# Altium PCB Kasli-DIOT.PCBDOC (part 16 of 23)
Units mm, origin at the board's own origin, x right, y up, seen from the top; angles counter-clockwise.
Board outline 222.9 x 100 mm, 10 copper layers (TopLayer, Layer 2, Layer 3, Layer 4, Layer 5, Layer 6, Layer 7, layer 8, Layer 9, BottomLayer), stack 1.564 mm thick; 977 components, 900 nets, 4676 pads, 2725 vias.
Unrouted connection lines stored in the file: 17.
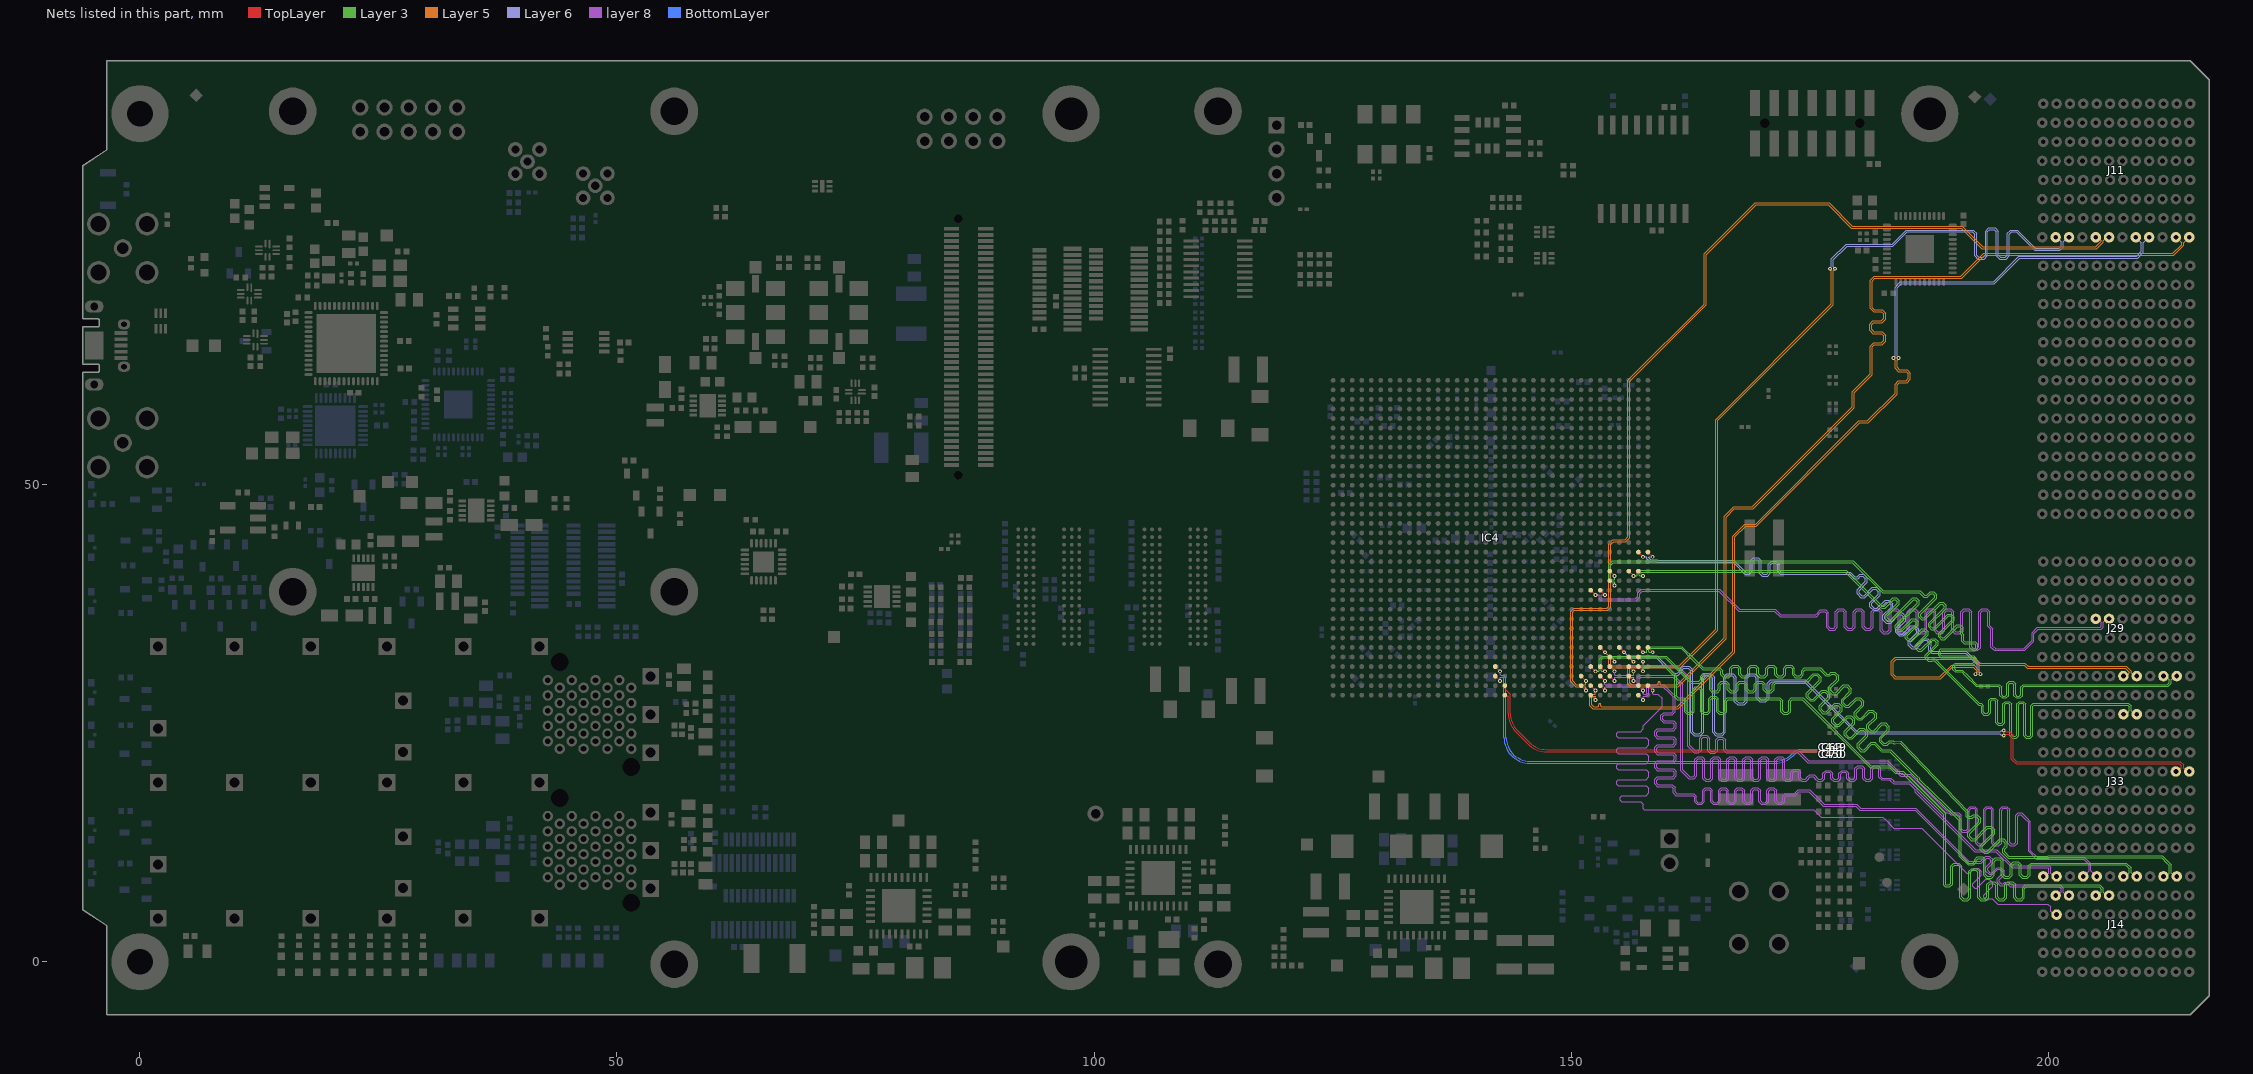
[diagram p22: the nets of this part, all layers, seen from the top]

## Via types
v1: diameter 0.4, hole 0.2, TopLayer to BottomLayer, tented both sides, 1723 vias
v2: diameter 0.5, hole 0.2, TopLayer to BottomLayer, tented both sides, 524 vias
v3: diameter 0.6, hole 0.3, TopLayer to BottomLayer, tented both sides, 172 vias
v4: diameter 0.6, hole 0.3, TopLayer to BottomLayer, 113 vias
v5: diameter 0.5, hole 0.2, TopLayer to BottomLayer, 107 vias
v6: diameter 0.4, hole 0.2, TopLayer to BottomLayer, 67 vias
v7: diameter 0.5, hole 0.25, TopLayer to BottomLayer, tented both sides, 12 vias
v8: diameter 0.8, hole 0.5, TopLayer to BottomLayer, tented both sides, 7 vias

## Nets (pads, with @x,y where several pads share a name; then routed paths per layer and width w, separated by ;. In a path a pad name is that pad's centre, name@x,y a point inside that pad or via, vN(x,y) a via of type N, cw(c..) or ccw(c..) an arc to the next point about the centre after c; other vN are vias at no path point) (continued)
SLOT1.LVDS_4_P: IC4.AN34 J14.K4 | length 97.7
  TopLayer w0.095: IC4.AN34@158.061,28.95 v1(158.561,28.45)
  layer 8 w0.075: v1(158.561,28.45) 158.561,28.095 158.605,28.051 159.117,28.051 159.561,27.607 159.561,26.725 158.207,25.371 157.561,24.725 157.561,24.416 157.283,24.138 154.965,24.138 154.806,23.979 154.806,23.661 154.965,23.501 157.891,23.501 158.169,23.224 158.169,22.738 157.891,22.46 154.965,22.46 154.806,22.301 154.806,21.983 154.965,21.823 157.891,21.823 158.169,21.546 158.169,21.06 157.891,20.782 154.965,20.782 154.806,20.623 154.806,20.305 154.965,20.145 157.891,20.145 158.169,19.868 158.169,19.382 157.891,19.104 154.965,19.104 154.806,18.945 154.806,18.627 154.965,18.467 157.891,18.467 158.169,18.19 158.169,17.704 157.891,17.426 155.31,17.426 155.15,17.267 155.15,16.949 155.31,16.789 157.283,16.789 157.561,16.512 157.561,16.331 157.561,16.069 157.666,15.964 175.44,15.964 175.831,15.573 176.241,15.163 182.701,15.163 182.938,14.926 183.839,14.025 186.751,14.025 186.811,13.966 191.428,9.348 191.497,9.28 191.722,9.28 192.267,9.825 192.66,9.825 193.003,9.481 193.003,9.089 192.083,8.169 192.083,7.944 192.309,7.718 192.534,7.718 193.454,8.638 193.846,8.638 194.19,8.295 194.19,7.902 193.27,6.982 193.27,6.757 193.495,6.532 193.72,6.532 193.786,6.598 194.179,6.598 194.308,6.468 194.376,6.4 194.724,6.052 199.995,6.052 200.301,5.746 200.301,5.299 200.65,4.95 J14.K4@200.9,4.95
SLOT1.LVDS_5_N: IC4.AL33 J14.H5 | length 96.4
  TopLayer w0.095: IC4.AL33@157.061,30.95 v1(157.561,30.45)
  Layer 3 w0.075: v1(157.561,30.45) 157.561,30.805 157.605,30.849 158.128,30.849 158.129,30.85 159.885,30.85 160.872,29.863 160.872,27.74 161.159,27.453 161.483,27.453 161.741,27.453 161.901,27.294 161.901,26.223 162.178,25.945 162.664,25.945 162.942,26.223 162.942,28.471 163.101,28.63 163.419,28.63 163.579,28.471 163.579,26.223 163.856,25.945 164.342,25.945 164.62,26.223 164.62,27.478 164.779,27.637 165.097,27.637 165.257,27.478 165.257,26.223 165.534,25.945 166.02,25.945 166.298,26.223 166.298,27.294 166.457,27.453 171.81,27.453 171.969,27.294 171.969,26.223 172.246,25.945 172.732,25.945 173.01,26.223 173.01,27.294 173.169,27.453 173.266,27.453 174.252,27.453 181.357,20.348 183.39,20.348 183.976,19.763 184.718,19.763 189.068,15.412 189.068,8.012 189.23,7.85 189.535,7.85 189.715,7.85 190.018,8.153 190.018,9.951 190.202,10.135 190.57,10.135 190.755,9.951 190.755,6.73 191.057,6.427 191.593,6.427 191.896,6.73 191.896,9.389 192.08,9.573 192.448,9.573 192.633,9.389 192.633,6.73 192.935,6.427 193.471,6.427 193.774,6.73 193.774,8.024 193.958,8.208 194.326,8.208 194.511,8.024 194.511,6.73 194.813,6.427 195.349,6.427 195.652,6.73 195.652,8.024 195.836,8.208 196.204,8.208 196.389,8.024 196.389,6.73 196.691,6.427 197.227,6.427 197.53,6.73 197.53,7.666 197.714,7.85 199.738,7.85 205.354,7.85 205.599,7.605 205.599,7.311 205.238,6.95 J14.H5@205,6.95
SLOT1.LVDS_5_P: IC4.AK33 J14.G5 | length 96.7
  TopLayer w0.095: IC4.AK33@157.061,31.95 v1(157.561,31.45)
  Layer 3 w0.075: v1(157.561,31.45) 157.561,31.095 157.605,31.051 158.044,31.051 158.045,31.052 159.969,31.052 161.074,29.946 161.074,27.824 161.243,27.655 161.483,27.655 161.825,27.655 162.103,27.377 162.103,26.306 162.262,26.147 162.58,26.147 162.74,26.306 162.74,28.555 163.017,28.832 163.503,28.832 163.781,28.555 163.781,26.306 163.94,26.147 164.258,26.147 164.418,26.306 164.418,27.561 164.695,27.839 165.181,27.839 165.459,27.561 165.459,26.306 165.618,26.147 165.936,26.147 166.096,26.306 166.096,27.377 166.373,27.655 171.893,27.655 172.171,27.377 172.171,26.306 172.33,26.147 172.649,26.147 172.808,26.306 172.808,27.377 173.085,27.655 173.266,27.655 174.336,27.655 181.441,20.55 183.474,20.55 184.059,19.965 184.801,19.965 189.27,15.496 189.27,8.096 189.314,8.052 189.535,8.052 189.631,8.052 189.816,8.236 189.816,10.034 190.118,10.337 190.654,10.337 190.957,10.034 190.957,6.813 191.141,6.629 191.509,6.629 191.694,6.813 191.694,9.472 191.996,9.775 192.532,9.775 192.835,9.472 192.835,6.813 193.019,6.629 193.387,6.629 193.572,6.813 193.572,8.108 193.874,8.41 194.41,8.41 194.713,8.108 194.713,6.813 194.897,6.629 195.265,6.629 195.45,6.813 195.45,8.108 195.752,8.41 196.288,8.41 196.591,8.108 196.591,6.813 196.775,6.629 197.143,6.629 197.328,6.813 197.328,7.749 197.63,8.052 199.738,8.052 205.438,8.052 205.801,7.689 205.801,7.311 206.162,6.95 J14.G5@206.4,6.95
SLOT1.LVDS_6_N: IC4.AP33 J14.K5 | length 96.3
  TopLayer w0.095: IC4.AP33@157.061,27.95 v1(157.561,27.45)
  layer 8 w0.075: v1(157.561,27.45) 157.561,27.805 157.605,27.849 157.961,27.849 158.163,28.051 158.163,28.65 158.363,28.85 159.641,28.85 160.218,28.272 160.705,27.786 160.705,27.569 160.705,26.274 160.546,26.115 159.7,26.115 159.422,25.837 159.422,25.352 159.7,25.074 160.664,25.074 160.824,24.915 160.824,24.596 160.664,24.437 159.043,24.437 158.765,24.159 158.765,23.674 159.043,23.396 160.664,23.396 160.824,23.237 160.824,22.918 160.664,22.759 159.043,22.759 158.765,22.481 158.765,21.996 159.043,21.718 160.664,21.718 160.824,21.559 160.824,21.24 160.664,21.081 159.043,21.081 158.765,20.803 158.765,20.318 159.043,20.04 160.664,20.04 160.824,19.881 160.824,19.562 160.664,19.403 159.043,19.403 158.765,19.125 158.765,18.64 159.043,18.362 160.546,18.362 160.705,18.203 160.705,18.106 160.705,17.723 160.996,17.432 162.625,17.432 162.789,17.432 162.949,17.273 162.949,16.775 163.226,16.497 163.712,16.497 163.99,16.775 163.99,17.881 164.149,18.04 164.467,18.04 164.627,17.881 164.627,16.775 164.904,16.497 165.39,16.497 165.668,16.775 165.668,17.881 165.827,18.04 166.145,18.04 166.305,17.881 166.305,16.775 166.582,16.497 167.068,16.497 167.346,16.775 167.346,17.881 167.505,18.04 167.823,18.04 167.983,17.881 167.983,16.775 168.26,16.497 168.746,16.497 169.024,16.775 169.024,17.881 169.183,18.04 169.501,18.04 169.661,17.881 169.661,16.775 169.938,16.497 170.424,16.497 170.702,16.775 170.702,17.881 170.861,18.04 171.179,18.04 171.339,17.881 171.339,16.775 171.616,16.497 172.102,16.497 172.38,16.775 172.38,17.273 172.539,17.432 172.635,17.432 173.496,17.432 173.896,17.832 174.924,17.832 176.336,16.421 176.454,16.302 179.85,16.302 180.279,15.874 186.074,15.874 191.62,10.328 192.621,10.328 192.734,10.328 193.014,10.328 193.553,10.867 193.779,10.867 194.004,10.642 194.004,10.417 193.481,9.894 193.481,9.502 193.824,9.158 194.217,9.158 194.74,9.681 194.965,9.681 195.19,9.456 195.19,9.23 194.667,8.708 194.667,8.315 195.011,7.971 195.403,7.971 195.559,8.127 195.784,8.127 195.852,8.059 196.061,7.85 201.186,7.85 201.399,7.637 201.399,7.299 201.049,6.95 J14.K5@200.8,6.95
SLOT1.LVDS_6_P: IC4.AN33 J14.J5 | length 96.6
  TopLayer w0.095: IC4.AN33@157.061,28.95 v1(157.561,28.45)
  layer 8 w0.075: v1(157.561,28.45) 157.561,28.095 157.605,28.051 157.877,28.051 157.961,28.135 157.961,28.734 158.279,29.052 159.724,29.052 160.504,28.272 160.907,27.869 160.907,27.569 160.907,26.191 160.63,25.913 159.783,25.913 159.624,25.754 159.624,25.435 159.783,25.276 160.748,25.276 161.026,24.998 161.026,24.513 160.748,24.235 159.126,24.235 158.967,24.076 158.967,23.757 159.126,23.598 160.748,23.598 161.026,23.32 161.026,22.835 160.748,22.557 159.126,22.557 158.967,22.398 158.967,22.079 159.126,21.92 160.748,21.92 161.026,21.642 161.026,21.157 160.748,20.879 159.126,20.879 158.967,20.72 158.967,20.401 159.126,20.242 160.748,20.242 161.026,19.964 161.026,19.479 160.748,19.201 159.126,19.201 158.967,19.042 158.967,18.723 159.126,18.564 160.63,18.564 160.907,18.286 160.907,18.106 160.907,17.806 161.079,17.634 162.625,17.634 162.873,17.634 163.151,17.357 163.151,16.859 163.31,16.699 163.628,16.699 163.788,16.859 163.788,17.965 164.065,18.242 164.551,18.242 164.829,17.965 164.829,16.859 164.988,16.699 165.306,16.699 165.466,16.859 165.466,17.965 165.743,18.242 166.229,18.242 166.507,17.965 166.507,16.859 166.666,16.699 166.984,16.699 167.144,16.859 167.144,17.965 167.421,18.242 167.907,18.242 168.185,17.965 168.185,16.859 168.344,16.699 168.662,16.699 168.822,16.859 168.822,17.965 169.099,18.242 169.585,18.242 169.863,17.965 169.863,16.859 170.022,16.699 170.34,16.699 170.5,16.859 170.5,17.965 170.777,18.242 171.263,18.242 171.541,17.965 171.541,16.859 171.7,16.699 172.018,16.699 172.178,16.859 172.178,17.357 172.455,17.634 172.635,17.634 173.412,17.634 173.812,18.034 175.008,18.034 176.538,16.504 179.934,16.504 180.362,16.076 186.158,16.076 191.704,10.53 192.705,10.53 192.817,10.53 192.93,10.53 193.47,11.069 193.862,11.069 194.206,10.726 194.206,10.333 193.683,9.81 193.683,9.585 193.908,9.36 194.133,9.36 194.656,9.883 195.049,9.883 195.392,9.539 195.392,9.147 194.869,8.624 194.869,8.399 195.095,8.173 195.32,8.173 195.475,8.329 195.868,8.329 195.927,8.27 195.995,8.201 196.145,8.052 201.27,8.052 201.601,7.721 201.601,7.299 201.95,6.95 J14.J5@202.2,6.95
SLOT1.LVDS_7_N: IC4.AJ34 J14.C6 | length 97.1
  TopLayer w0.095: IC4.AJ34@158.061,32.95 v1(158.561,32.45)
  Layer 3 w0.075: v1(158.561,32.45) 158.206,32.45 158.162,32.494 158.162,32.727 158.283,32.848 161.548,32.848 162.662,31.735 163.793,30.603 164.488,30.603 165.524,30.603 165.708,30.419 165.708,30.087 166.011,29.784 166.546,29.784 166.849,30.087 166.849,30.696 167.033,30.88 167.402,30.88 167.586,30.696 167.586,30.087 167.889,29.784 168.424,29.784 168.727,30.087 168.727,30.696 168.911,30.88 169.28,30.88 169.464,30.696 169.464,30.087 169.767,29.784 170.302,29.784 170.605,30.087 170.605,30.696 170.789,30.88 171.158,30.88 171.342,30.696 171.342,30.087 171.645,29.784 172.18,29.784 172.483,30.087 172.483,30.696 172.667,30.88 173.036,30.88 173.22,30.696 173.22,30.087 173.523,29.784 174.058,29.784 174.361,30.087 174.361,30.419 174.545,30.603 176.069,30.603 176.468,30.204 176.536,30.135 176.59,30.082 176.709,29.963 177.137,29.963 177.316,30.142 177.576,30.142 177.837,29.882 177.837,29.621 177.027,28.811 177.027,28.383 177.406,28.004 177.834,28.004 178.644,28.814 178.904,28.814 179.165,28.554 179.165,28.293 178.355,27.483 178.355,27.055 178.734,26.676 179.162,26.676 179.972,27.486 180.232,27.486 180.493,27.226 180.493,26.965 179.683,26.155 179.683,25.727 180.062,25.349 180.49,25.349 181.3,26.159 181.56,26.159 181.821,25.898 181.821,25.637 181.011,24.827 181.011,24.399 181.39,24.021 181.818,24.021 182.628,24.831 182.888,24.831 183.149,24.57 183.149,24.309 182.339,23.499 182.339,23.072 182.718,22.693 183.146,22.693 183.432,22.979 183.693,22.979 183.761,22.911 183.82,22.852 183.988,22.852 183.994,22.858 184.486,22.898 184.52,22.898 184.543,22.875 191.453,15.665 191.453,15.634 191.446,15.312 191.446,15.226 191.505,15.167 191.573,15.098 191.632,15.039 192.06,15.039 192.24,15.219 192.5,15.219 192.761,14.958 192.761,14.698 191.582,13.519 191.582,13.091 191.961,12.712 192.389,12.712 193.686,14.009 193.947,14.009 194.207,13.749 194.207,13.488 192.91,12.191 192.91,11.763 193.289,11.384 193.717,11.384 195.014,12.681 195.275,12.681 195.535,12.421 195.535,12.16 195.237,11.862 195.237,11.434 195.783,10.889 195.811,10.861 195.892,10.861 200.053,10.861 200.099,10.906 211.905,10.906 212.461,10.35 212.699,10.112 212.699,9.299 212.349,8.95 J14.C6@212.1,8.95
SLOT1.LVDS_7_P: IC4.AJ33 J14.B6 | length 97.8
  TopLayer w0.095: IC4.AJ33@157.061,32.95 v1(157.561,32.45)
  Layer 3 w0.075: v1(157.561,32.45) 157.916,32.45 157.96,32.494 157.96,32.81 158.2,33.05 161.632,33.05 162.947,31.735 163.877,30.805 164.488,30.805 165.607,30.805 165.91,30.502 165.91,30.171 166.094,29.986 166.463,29.986 166.647,30.171 166.647,30.779 166.95,31.082 167.485,31.082 167.788,30.779 167.788,30.171 167.972,29.986 168.341,29.986 168.525,30.171 168.525,30.779 168.828,31.082 169.363,31.082 169.666,30.779 169.666,30.171 169.85,29.986 170.219,29.986 170.403,30.171 170.403,30.779 170.706,31.082 171.241,31.082 171.544,30.779 171.544,30.171 171.728,29.986 172.097,29.986 172.281,30.171 172.281,30.779 172.584,31.082 173.119,31.082 173.422,30.779 173.422,30.171 173.606,29.986 173.975,29.986 174.159,30.171 174.159,30.502 174.462,30.805 176.069,30.805 176.152,30.805 176.611,30.347 176.679,30.278 176.792,30.165 177.053,30.165 177.232,30.344 177.66,30.344 178.039,29.965 178.039,29.538 177.229,28.728 177.229,28.467 177.49,28.206 177.75,28.206 178.56,29.016 178.988,29.016 179.367,28.638 179.367,28.21 178.557,27.4 178.557,27.139 178.818,26.878 179.078,26.878 179.888,27.688 180.316,27.688 180.695,27.31 180.695,26.882 179.885,26.072 179.885,25.811 180.146,25.551 180.406,25.551 181.216,26.361 181.644,26.361 182.023,25.982 182.023,25.554 181.213,24.744 181.213,24.483 181.473,24.223 181.734,24.223 182.544,25.033 182.972,25.033 183.351,24.654 183.351,24.226 182.541,23.416 182.541,23.155 182.801,22.895 183.062,22.895 183.348,23.181 183.776,23.181 183.904,23.054 184.565,23.107 184.6,23.107 184.622,23.084 191.656,15.744 191.656,15.713 191.654,15.629 191.648,15.31 191.716,15.241 191.977,15.241 192.156,15.421 192.584,15.421 192.963,15.042 192.963,14.614 191.784,13.435 191.784,13.174 192.045,12.914 192.305,12.914 193.602,14.211 194.03,14.211 194.409,13.832 194.409,13.404 193.112,12.107 193.112,11.846 193.372,11.586 193.633,11.586 194.93,12.883 195.358,12.883 195.737,12.504 195.737,12.076 195.439,11.779 195.439,11.518 195.867,11.091 195.895,11.063 196.094,11.063 199.969,11.063 200.015,11.108 211.989,11.108 212.461,10.636 212.901,10.196 212.901,9.299 213.25,8.95 J14.B6@213.5,8.95
SLOT1.LVDS_8_N: IC4.AL29 J14.F6 | length 102.2
  TopLayer w0.095: IC4.AL29@153.061,30.95 v1(153.561,30.45)
  Layer 3 w0.075: v1(153.561,30.45) 153.206,30.45 153.162,30.494 153.162,31.651 153.361,31.85 159.896,31.85 162.041,29.705 162.539,29.207 162.86,29.207 163.48,29.207 163.783,29.51 163.783,29.842 163.967,30.026 164.336,30.026 164.52,29.842 164.52,28.517 164.822,28.214 165.358,28.214 165.661,28.517 165.661,29.023 165.845,29.207 166.214,29.207 166.398,29.023 166.398,28.517 166.7,28.214 167.236,28.214 167.539,28.517 167.539,29.023 167.723,29.207 168.092,29.207 168.276,29.023 168.276,28.517 168.578,28.214 169.114,28.214 169.417,28.517 169.417,29.023 169.601,29.207 169.97,29.207 170.154,29.023 170.154,28.517 170.456,28.214 170.992,28.214 171.295,28.517 171.295,29.023 171.479,29.207 171.576,29.207 174.09,29.207 174.689,29.207 175.499,30.018 175.76,30.018 176.02,29.757 176.02,29.497 174.676,28.153 174.676,27.725 175.055,27.346 175.483,27.346 176.377,28.24 176.637,28.24 176.898,27.979 176.898,27.719 176.004,26.825 176.004,26.397 176.383,26.018 176.811,26.018 177.705,26.912 177.965,26.912 178.226,26.651 178.226,26.391 177.332,25.497 177.332,25.069 177.711,24.69 178.139,24.69 179.033,25.584 179.293,25.584 179.554,25.323 179.554,25.063 178.66,24.169 178.66,23.741 179.039,23.362 179.467,23.362 180.361,24.256 180.621,24.256 180.882,23.995 180.882,23.735 179.988,22.841 179.988,22.413 180.367,22.034 180.795,22.034 181.547,22.787 181.808,22.787 181.876,22.718 182.491,22.103 ; 182.492,22.102 182.551,22.043 183.426,22.043 186.21,19.259 186.231,19.259 186.356,19.133 186.356,18.985 ; 186.355,18.986 190.666,14.822 190.71,14.778 190.71,11.055 191.615,10.15 191.887,10.15 192.198,10.15 192.5,10.453 192.5,10.623 192.684,10.807 193.053,10.807 193.237,10.623 193.237,9.088 193.54,8.785 194.076,8.785 194.378,9.088 194.378,10.497 194.562,10.681 194.931,10.681 195.115,10.497 195.115,9.088 195.418,8.785 195.954,8.785 196.256,9.088 196.256,10.099 196.44,10.284 196.809,10.284 196.993,10.099 196.993,9.088 197.296,8.785 197.832,8.785 198.134,9.088 198.134,9.966 198.318,10.15 198.415,10.15 208.119,10.15 208.499,9.77 208.499,9.311 208.138,8.95 J14.F6@207.9,8.95
SLOT1.LVDS_8_P: IC4.AL28 J14.E6 | length 102.9
  TopLayer w0.095: IC4.AL28@152.061,30.95 v1(152.561,30.45)
  Layer 3 w0.075: v1(152.561,30.45) 152.916,30.45 152.96,30.494 152.96,31.735 153.277,32.052 159.98,32.052 162.041,29.991 162.622,29.409 162.86,29.409 163.397,29.409 163.581,29.594 163.581,29.925 163.883,30.228 164.419,30.228 164.722,29.925 164.722,28.6 164.906,28.416 165.275,28.416 165.459,28.6 165.459,29.107 165.761,29.409 166.297,29.409 166.6,29.107 166.6,28.6 166.784,28.416 167.153,28.416 167.337,28.6 167.337,29.107 167.639,29.409 168.175,29.409 168.478,29.107 168.478,28.6 168.662,28.416 169.031,28.416 169.215,28.6 169.215,29.107 169.517,29.409 170.053,29.409 170.356,29.107 170.356,28.6 170.54,28.416 170.909,28.416 171.093,28.6 171.093,29.107 171.395,29.409 171.576,29.409 174.292,29.409 174.605,29.409 175.415,30.22 175.843,30.22 176.222,29.841 176.222,29.413 174.878,28.069 174.878,27.809 175.139,27.548 175.399,27.548 176.293,28.442 176.721,28.442 177.1,28.063 177.1,27.635 176.206,26.741 176.206,26.481 176.467,26.22 176.727,26.22 177.621,27.114 178.049,27.114 178.428,26.735 178.428,26.307 177.534,25.413 177.534,25.153 177.795,24.892 178.055,24.892 178.949,25.786 179.377,25.786 179.756,25.407 179.756,24.979 178.862,24.085 178.862,23.825 179.123,23.564 179.383,23.564 180.277,24.458 180.705,24.458 181.084,24.079 181.084,23.651 180.19,22.757 180.19,22.497 180.451,22.236 180.711,22.236 181.464,22.989 181.891,22.989 181.951,22.929 182.019,22.861 182.635,22.245 183.51,22.245 186.294,19.461 186.315,19.461 186.558,19.217 186.558,19.071 ; 186.557,19.072 190.75,15.024 190.912,14.862 190.912,11.138 191.699,10.352 191.887,10.352 192.114,10.352 192.298,10.536 192.298,10.706 192.601,11.009 193.137,11.009 193.439,10.706 193.439,9.172 193.623,8.987 193.992,8.987 194.176,9.172 194.176,10.581 194.479,10.883 195.015,10.883 195.317,10.581 195.317,9.172 195.501,8.987 195.87,8.987 196.054,9.172 196.054,10.183 196.357,10.486 196.893,10.486 197.195,10.183 197.195,9.172 197.379,8.987 197.748,8.987 197.932,9.172 197.932,10.049 198.235,10.352 198.415,10.352 208.203,10.352 208.701,9.854 208.701,9.311 209.062,8.95 J14.E6@209.3,8.95
SLOT1.LVDS_9_N: IC4.AM30 J14.I6 | length 97.9
  TopLayer w0.095: IC4.AM30@154.061,29.95 v1(154.561,29.45)
  layer 8 w0.075: v1(154.561,29.45) 154.561,29.805 154.605,29.849 155.896,29.849 156.163,30.116 156.163,30.702 156.311,30.85 161.068,30.85 161.69,30.228 162.238,29.679 162.238,22.597 162.915,21.92 163.226,21.92 163.406,21.92 163.684,22.198 163.684,23.367 163.843,23.526 164.162,23.526 164.321,23.367 164.321,22.14 164.599,21.862 165.084,21.862 165.362,22.14 165.362,23.196 165.521,23.355 165.84,23.355 165.999,23.196 165.999,22.198 166.277,21.92 167.183,21.92 173.777,21.92 174.811,20.886 183.101,20.886 184.434,19.553 184.552,19.435 185.459,19.435 189.283,15.61 189.592,15.61 189.675,15.527 189.78,15.422 190.567,15.422 190.726,15.262 190.726,13.871 191.004,13.594 191.49,13.594 191.767,13.871 191.767,15.911 191.926,16.071 192.245,16.071 192.404,15.911 192.404,12.427 192.682,12.149 193.168,12.149 193.445,12.427 193.445,15.911 193.604,16.071 193.923,16.071 194.082,15.911 194.082,12.427 194.36,12.149 194.846,12.149 195.123,12.427 195.123,15.911 195.282,16.071 195.601,16.071 195.76,15.911 195.76,12.427 196.038,12.149 196.524,12.149 196.801,12.427 196.801,15.262 196.96,15.422 197.057,15.422 197.154,15.422 197.478,15.097 197.959,14.616 197.959,11.566 198.775,10.75 203.736,10.75 204.299,10.187 204.299,9.549 J14.I6@203.7,8.95
SLOT1.LVDS_9_P: IC4.AL30 J14.H6 | length 98.2
  TopLayer w0.095: IC4.AL30@154.061,30.95 v1(154.561,30.45)
  layer 8 w0.075: v1(154.561,30.45) 154.561,30.095 154.605,30.051 155.812,30.051 155.961,30.2 155.961,30.786 156.227,31.052 161.151,31.052 161.69,30.513 162.44,29.763 162.44,22.68 162.999,22.122 163.226,22.122 163.323,22.122 163.482,22.281 163.482,23.45 163.76,23.728 164.245,23.728 164.523,23.45 164.523,22.224 164.682,22.064 165.001,22.064 165.16,22.224 165.16,23.28 165.438,23.557 165.923,23.557 166.201,23.28 166.201,22.281 166.36,22.122 167.183,22.122 173.861,22.122 174.894,21.088 183.184,21.088 184.636,19.637 185.542,19.637 189.367,15.812 189.675,15.812 189.864,15.624 190.651,15.624 190.928,15.346 190.928,13.955 191.087,13.796 191.406,13.796 191.565,13.955 191.565,15.995 191.843,16.273 192.329,16.273 192.606,15.995 192.606,12.51 192.765,12.351 193.084,12.351 193.243,12.51 193.243,15.995 193.521,16.273 194.007,16.273 194.284,15.995 194.284,12.51 194.443,12.351 194.762,12.351 194.921,12.51 194.921,15.995 195.199,16.273 195.685,16.273 195.962,15.995 195.962,12.51 196.121,12.351 196.44,12.351 196.599,12.51 196.599,15.346 196.877,15.624 197.057,15.624 197.237,15.624 197.764,15.097 198.161,14.7 198.161,11.65 198.859,10.952 203.82,10.952 204.501,10.271 204.501,9.549 J14.H6@205.1,8.95
SLOT1.LVDS_10_N: IC4.AN29 J14.L6 | length 97.7
  TopLayer w0.095: IC4.AN29@153.061,28.95 v1(153.561,28.45)
  layer 8 w0.075: v1(153.561,28.45) 153.561,28.805 153.605,28.849 156.97,28.849 157.163,29.042 157.163,29.675 157.336,29.848 160.678,29.848 161.274,29.252 161.518,29.008 161.518,20.043 162.357,19.204 162.729,19.204 162.91,19.204 163.187,19.482 163.187,21.126 163.346,21.285 163.665,21.285 163.824,21.126 163.824,19.192 164.102,18.914 164.588,18.914 164.865,19.192 164.865,21.126 165.024,21.285 165.343,21.285 165.502,21.126 165.502,19.193 165.78,18.915 166.266,18.915 166.543,19.193 166.543,21.126 166.702,21.286 167.021,21.286 167.18,21.126 167.18,19.193 167.458,18.915 167.944,18.915 168.221,19.193 168.221,21.127 168.38,21.286 168.699,21.286 168.858,21.127 168.858,19.193 169.136,18.916 169.622,18.916 169.899,19.193 169.899,21.127 170.058,21.287 170.377,21.287 170.536,21.127 170.536,19.194 170.814,18.916 171.3,18.916 171.577,19.194 171.577,21.128 171.736,21.287 172.055,21.287 172.214,21.128 172.214,19.194 172.492,18.917 172.978,18.917 173.255,19.194 173.255,19.801 173.414,19.961 173.733,19.961 173.892,19.801 173.892,19.195 174.17,18.917 174.656,18.917 174.933,19.195 174.933,19.251 175.092,19.411 175.411,19.411 175.57,19.251 175.57,19.195 175.848,18.918 176.334,18.918 176.611,19.195 176.611,19.686 176.77,19.845 177.089,19.845 177.248,19.686 177.248,19.196 177.526,18.918 178.012,18.918 178.289,19.196 178.289,19.686 178.448,19.845 178.767,19.845 178.926,19.686 178.926,19.196 179.204,18.918 179.69,18.918 179.967,19.196 179.967,20.184 180.126,20.343 180.445,20.343 180.604,20.184 180.604,19.197 180.882,18.919 181.368,18.919 181.645,19.197 181.645,20.184 181.804,20.343 182.123,20.343 182.282,20.184 182.282,19.335 182.56,19.058 183.041,19.058 183.425,19.058 183.471,19.011 183.471,18.996 183.804,18.664 185.457,18.664 185.6,18.521 186.076,18.045 186.076,17.77 192.314,11.532 194.543,11.532 196.225,9.85 200.036,9.85 200.099,9.787 200.099,9.299 199.749,8.95 J14.L6@199.5,8.95
SLOT1.LVDS_10_P: IC4.AM29 J14.K6 | length 98
  TopLayer w0.095: IC4.AM29@153.061,29.95 v1(153.561,29.45)
  layer 8 w0.075: v1(153.561,29.45) 153.561,29.095 153.605,29.051 156.886,29.051 156.961,29.126 156.961,29.759 157.252,30.05 160.761,30.05 161.559,29.252 161.72,29.091 161.72,20.127 162.44,19.406 162.729,19.406 162.826,19.406 162.985,19.565 162.985,21.209 163.263,21.487 163.749,21.487 164.026,21.209 164.026,19.276 164.185,19.116 164.504,19.116 164.663,19.276 164.663,21.21 164.941,21.487 165.427,21.487 165.704,21.21 165.704,19.276 165.863,19.117 166.182,19.117 166.341,19.276 166.341,21.21 166.619,21.488 167.105,21.488 167.382,21.21 167.382,19.277 167.541,19.117 167.86,19.117 168.019,19.277 168.019,21.211 168.297,21.488 168.783,21.488 169.06,21.211 169.06,19.277 169.219,19.118 169.538,19.118 169.697,19.277 169.697,21.211 169.975,21.489 170.461,21.489 170.738,21.211 170.738,19.278 170.897,19.118 171.216,19.118 171.375,19.278 171.375,21.211 171.653,21.489 172.139,21.489 172.416,21.211 172.416,19.278 172.575,19.119 172.894,19.119 173.053,19.278 173.053,19.885 173.331,20.163 173.817,20.163 174.094,19.885 174.094,19.278 174.253,19.119 174.572,19.119 174.731,19.278 174.731,19.335 175.009,19.613 175.495,19.613 175.772,19.335 175.772,19.279 175.931,19.12 176.25,19.12 176.409,19.279 176.409,19.769 176.687,20.047 177.173,20.047 177.45,19.769 177.45,19.279 177.609,19.12 177.928,19.12 178.087,19.279 178.087,19.769 178.365,20.047 178.851,20.047 179.128,19.769 179.128,19.28 179.287,19.12 179.606,19.12 179.765,19.28 179.765,20.267 180.043,20.545 180.529,20.545 180.806,20.267 180.806,19.28 180.965,19.121 181.284,19.121 181.443,19.28 181.443,20.267 181.721,20.545 182.207,20.545 182.484,20.267 182.484,19.419 182.643,19.26 183.041,19.26 183.508,19.26 183.804,18.964 183.804,18.949 183.888,18.866 185.541,18.866 185.6,18.807 186.278,18.128 186.278,17.853 186.796,17.336 192.398,11.734 194.627,11.734 196.309,10.052 200.12,10.052 200.301,9.871 200.301,9.299 200.65,8.95 J14.K6@200.9,8.95
SLOT1.LVDS_11_N: IC4.AM32 J11.B1 | length 98.9
  TopLayer w0.095: IC4.AM32@156.061,29.95 v1(156.561,29.45)
  Layer 5 w0.08: v1(156.561,29.45) 156.561,29.8 156.514,29.846 156.338,29.846 156.161,29.67 156.161,29.25 156.361,29.05 156.769,29.05 159.007,29.05 ccw(c159.007,29.165) 159.122,29.165 159.122,29.243 cw(c159.237,29.243) 159.237,29.358 cw(c159.237,29.243) 159.352,29.243 159.352,29.165 ccw(c159.467,29.165) 159.467,29.05 159.737,29.05 161.161,29.05 166.054,33.943 166.054,46.686 167.05,47.682 168.993,47.682 179.481,58.17 179.481,59.753 181.354,61.627 181.354,64.154 181.354,64.543 181.711,64.9 182.526,64.9 182.762,65.135 182.762,65.606 182.526,65.842 181.646,65.842 181.29,66.198 181.29,66.841 181.646,67.198 182.526,67.198 182.762,67.433 182.762,67.904 182.526,68.14 181.711,68.14 181.354,68.496 181.354,68.683 181.354,71.436 181.768,71.85 190.868,71.85 193.268,74.25 213.075,74.25 213.996,75.171 213.996,75.354 J11.B1@213.4,75.95
SLOT1.LVDS_11_P: IC4.AL32 J11.A1 | length 99.6
  TopLayer w0.095: IC4.AL32@156.061,30.95 v1(156.561,30.45)
  Layer 5 w0.08: v1(156.561,30.45) 156.561,30.1 156.514,30.053 156.252,30.053 155.954,29.756 155.954,29.164 156.275,28.843 161.247,28.843 166.261,33.857 166.261,46.6 167.136,47.475 169.079,47.475 179.688,58.084 179.688,59.667 181.561,61.541 181.561,64.154 181.561,64.457 181.796,64.693 182.612,64.693 182.969,65.049 182.969,65.692 182.612,66.049 181.732,66.049 181.497,66.284 181.497,66.755 181.732,66.991 182.612,66.991 182.969,67.347 182.969,67.99 182.612,68.347 181.796,68.347 181.561,68.582 181.561,68.683 181.561,71.35 181.854,71.643 190.954,71.643 193.354,74.043 213.161,74.043 214.203,75.085 214.203,75.354 J11.A1@214.8,75.95
SLOT1.LVDS_12_N: IC4.AP28 J11.E1 | length 97.7
  TopLayer w0.095: IC4.AP28@152.061,27.95 v1(152.561,27.45)
  Layer 5 w0.08: v1(152.561,27.45) 152.561,27.8 152.514,27.846 152.339,27.846 152.161,27.668 152.161,26.95 152.361,26.75 152.517,26.75 152.783,26.75 ccw(c152.783,26.865) 152.898,26.865 152.898,26.943 cw(c153.013,26.943) 153.013,27.058 cw(c153.013,26.943) 153.128,26.943 153.128,26.865 ccw(c153.243,26.865) 153.243,26.75 153.513,26.75 161.161,26.75 166.954,32.543 166.954,44.618 168.218,45.882 169.348,45.882 180.156,56.69 181.052,56.69 183.963,59.601 183.963,59.926 183.963,60.558 184.32,60.915 185.135,60.915 185.371,61.15 185.371,61.621 185.135,61.857 184.32,61.857 183.963,62.214 183.963,62.4 183.963,63.073 183.803,63.233 v1(183.803,63.28)
  Layer 6 w0.08: v1(183.803,63.28) 183.803,63.327 183.963,63.487 183.963,70.72 184.536,71.292 194.286,71.292 196.95,73.957 209.293,73.957 209.796,74.46 209.796,75.354 J11.E1@209.2,75.95
SLOT1.LVDS_12_P: IC4.AN28 J11.D1 | length 98.4
  TopLayer w0.095: IC4.AN28@152.061,28.95 v1(152.561,28.45)
  Layer 5 w0.08: v1(152.561,28.45) 152.561,28.1 152.514,28.053 152.254,28.053 151.954,27.754 151.954,26.864 152.275,26.543 161.247,26.543 167.161,32.457 167.161,44.532 168.304,45.675 169.434,45.675 180.241,56.483 181.137,56.483 184.17,59.516 184.17,59.926 184.17,60.472 184.405,60.708 185.221,60.708 185.578,61.065 185.578,61.707 185.221,62.064 184.405,62.064 184.17,62.299 184.17,62.4 184.17,63.073 184.33,63.233 v1(184.33,63.28)
  Layer 6 w0.08: v1(184.33,63.28) 184.33,63.327 184.17,63.487 184.17,70.634 184.621,71.085 194.371,71.085 197.036,73.75 209.378,73.75 210.003,74.375 210.003,75.354 J11.D1@210.6,75.95
SLOT1.LVDS_13_N: IC4.AN27 J11.H1 | length 103.1
  TopLayer w0.095: IC4.AN27@151.061,28.95 v1(151.561,28.45)
  Layer 5 w0.08: v1(151.561,28.45) 151.561,28.8 151.514,28.846 150.472,28.846 149.954,29.364 149.954,36.736 150.268,37.05 153.761,37.05 153.961,37.25 153.961,43.843 154.375,44.257 155.668,44.257 155.954,44.543 155.954,60.943 163.954,68.943 163.954,74.194 169.312,79.552 177.051,79.552 179.48,77.123 190.988,77.123 193.161,74.95 205.014,74.95 205.596,75.533 205.596,75.599 205.245,75.95 J11.H1@205,75.95
SLOT1.LVDS_13_P: IC4.AM27 J11.G1 | length 102.8
  TopLayer w0.095: IC4.AM27@151.061,29.95 v1(151.561,29.45)
  Layer 5 w0.08: v1(151.561,29.45) 151.561,29.1 151.514,29.053 150.558,29.053 150.161,29.45 150.161,36.65 150.354,36.843 153.847,36.843 154.168,37.164 154.168,43.757 154.461,44.05 155.754,44.05 156.161,44.457 156.161,60.857 164.161,68.857 164.161,74.109 169.398,79.345 176.966,79.345 179.395,76.916 190.902,76.916 193.075,74.743 205.099,74.743 205.803,75.447 205.803,75.599 206.154,75.95 J11.G1@206.4,75.95
SLOT1.LVDS_14_N: IC4.AK30 J11.K1 | length 97
  TopLayer w0.095: IC4.AK30@154.061,31.95 v1(154.561,31.45)
  Layer 5 w0.08: v1(154.561,31.45) 154.5,31.511 154.5,31.734 154.263,31.971 154.197,31.971 154.15,31.924 154.15,31.154 154.254,31.05 161.368,31.05 165.154,34.836 165.154,56.843 177.294,68.983 177.294,72.443 177.134,72.603 v1(177.134,72.65)
  Layer 6 w0.08: v1(177.134,72.65) 177.134,72.697 177.294,72.857 177.294,73.676 178.843,75.225 183.651,75.225 185.133,76.707 191.665,76.707 192.15,76.707 192.506,76.35 192.506,74.073 192.742,73.837 193.213,73.837 193.448,74.073 193.448,76.593 193.805,76.949 194.448,76.949 194.804,76.593 194.804,74.073 195.04,73.837 195.511,73.837 195.746,74.073 195.746,76.35 196.103,76.707 196.29,76.707 196.753,76.707 198.685,74.775 201.161,74.775 201.396,75.01 201.396,75.477 200.923,75.95 J11.K1@200.8,75.95
SLOT1.LVDS_14_P: IC4.AJ29 J11.J1 | length 97.6
  TopLayer w0.095: IC4.AJ29@153.061,32.95 v1(153.561,32.45)
  Layer 5 w0.08: v1(153.561,32.45) 153.943,32.068 153.943,31.068 154.168,30.843 161.454,30.843 165.361,34.75 165.361,56.757 177.501,68.897 177.501,72.443 177.661,72.603 v1(177.661,72.65)
  Layer 6 w0.08: v1(177.661,72.65) 177.661,72.697 177.501,72.857 177.501,73.59 178.929,75.018 183.737,75.018 185.219,76.5 191.665,76.5 192.064,76.5 192.299,76.265 192.299,73.987 192.656,73.63 193.299,73.63 193.655,73.987 193.655,76.507 193.891,76.742 194.362,76.742 194.597,76.507 194.597,73.987 194.954,73.63 195.597,73.63 195.953,73.987 195.953,76.265 196.189,76.5 196.29,76.5 196.668,76.5 198.6,74.568 201.247,74.568 201.603,74.925 201.603,75.477 202.076,75.95 J11.J1@202.2,75.95
SLOT1.LVDS_15_N: IC4.AK32 J33.B5 | length 100.1
  TopLayer w0.095: IC4.AK32@156.061,31.95 v1(156.561,31.45) ; v1(195.361,23.723) 195.417,23.723 195.569,23.875 195.922,23.875 196.139,23.658 196.139,21.258 196.647,20.75 213.784,20.75 213.989,20.545 213.989,20.307 213.632,19.95 J33.B5@213.4,19.95
  Layer 6 w0.08: v1(156.561,31.45) 156.275,31.736 156.275,31.802 156.322,31.849 158.925,31.849 160.1,30.675 160.1,30.671 160.508,30.264 160.735,30.037 161.239,30.037 161.596,30.393 161.596,30.523 161.832,30.758 162.303,30.758 162.538,30.523 162.538,24.046 162.895,23.689 163.537,23.689 163.894,24.046 163.894,29.728 164.13,29.963 164.601,29.963 164.836,29.728 164.836,24.046 165.193,23.689 165.835,23.689 166.192,24.046 166.192,29.728 166.428,29.963 166.899,29.963 167.134,29.728 167.134,27.282 167.491,26.925 168.133,26.925 168.49,27.282 168.49,29.728 168.726,29.963 169.197,29.963 169.432,29.728 169.432,27.632 169.789,27.275 170.431,27.275 170.788,27.632 170.788,29.115 171.024,29.35 171.124,29.35 174.467,29.35 179.934,23.883 194.964,23.883 194.971,23.876 ccw(c195.361,24.25) 195.311,23.712 195.32,23.723 v1(195.361,23.723)
SLOT1.LVDS_15_P: IC4.AJ31 J33.A5 | length 100.9
  TopLayer w0.095: IC4.AJ31@155.061,32.95 v1(155.561,32.45) ; v1(195.361,24.25) 195.417,24.25 195.569,24.098 196.013,24.098 196.361,23.75 196.361,21.35 196.739,20.972 213.876,20.972 214.211,20.637 214.211,20.307 214.568,19.95 J33.A5@214.8,19.95
  Layer 6 w0.08: v1(155.561,32.45) 155.955,32.056 159.011,32.056 160.307,30.76 160.307,30.757 160.508,30.556 160.82,30.244 161.154,30.244 161.389,30.479 161.389,30.608 161.746,30.965 162.388,30.965 162.745,30.608 162.745,24.131 162.981,23.896 163.452,23.896 163.687,24.131 163.687,29.813 164.044,30.17 164.686,30.17 165.043,29.813 165.043,24.131 165.279,23.896 165.75,23.896 165.985,24.131 165.985,29.813 166.342,30.17 166.984,30.17 167.341,29.813 167.341,27.367 167.577,27.132 168.048,27.132 168.283,27.367 168.283,29.813 168.64,30.17 169.282,30.17 169.639,29.813 169.639,27.718 169.875,27.482 170.346,27.482 170.581,27.718 170.581,29.2 170.938,29.557 171.124,29.557 174.553,29.557 180.02,24.09 194.964,24.09 194.971,24.097 cw(c195.361,23.723) 195.313,24.261 195.314,24.257 195.32,24.25 v1(195.361,24.25)
SLOT1_MGT.MGT_Rx_N: C450.2 IC4.AM18 | length 43.8
  TopLayer w0.095: IC4.AM18@142.061,29.95 v1(142.561,29.45)
  BottomLayer w0.095: v1(142.561,29.45) 142.561,29.783 142.617,29.839 142.862,29.839 142.961,29.74 142.961,23.561 ccw(c145.719,23.561) 145.719,20.803 171.346,20.803 ccw(c171.346,23.562) 173.297,21.611 173.436,21.75 cw(c174.103,21.083) 174.103,22.026 176.796,22.026 cw(c176.796,21.889) 176.893,21.986 cw(c176.856,21.949) 176.909,21.949 ccw(c176.961,21.949) 176.924,21.912 177.043,21.793 ccw(c177.086,21.835) C450.2@177.086,21.775
SLOT1_MGT.MGT_Rx_P: C449.2 IC4.AL18 | length 43.9
  TopLayer w0.095: IC4.AL18@142.061,30.95 v1(142.561,30.45)
  BottomLayer w0.095: v1(142.561,30.45) 142.561,30.117 142.617,30.061 142.954,30.061 143.183,29.832 143.183,23.565 ccw(c145.723,23.565) 145.723,21.025 171.345,21.025 ccw(c171.345,23.565) 173.141,21.769 173.279,21.907 cw(c174.103,21.084) 174.103,22.248 176.796,22.248 ccw(c176.796,22.386) 176.893,22.289 ccw(c176.856,22.326) 176.909,22.326 cw(c176.961,22.326) 176.924,22.363 177.043,22.482 cw(c177.086,22.44) C449.2@177.086,22.5
SLOT1_MGT.MGT_Tx_N: C70.1 IC4.AP19 | length 38.1
  TopLayer w0.095: IC4.AP19@143.061,27.95 143.128,27.883 143.359,27.883 143.414,27.827 143.414,26.045 ccw(c146.175,26.045) 144.222,24.094 ccw(c146.175,26.045) 144.223,24.093 145.481,22.835 ccw(c147.433,24.787) 145.484,22.832 ccw(c147.433,24.787) 147.433,22.026 176.796,22.026 cw(c176.796,21.889) 176.893,21.986 cw(c176.856,21.949) 176.909,21.949 ccw(c176.961,21.949) 176.924,21.912 177.043,21.793 ccw(c177.086,21.835) C70.1@177.086,21.775
SLOT1_MGT.MGT_Tx_P: C63.1 IC4.AN19 | length 38.7
  TopLayer w0.095: IC4.AN19@143.061,28.95 143.093,28.918 143.093,28.573 143.636,28.029 143.636,26.045 ccw(c146.176,26.045) 144.38,24.249 145.637,22.992 ccw(c147.433,24.788) 147.433,22.248 176.796,22.248 ccw(c176.796,22.386) 176.893,22.289 ccw(c176.856,22.326) 176.909,22.326 cw(c176.961,22.326) C63.1@176.924,22.363 ; C63.1@176.924,22.363 177.043,22.482 cw(c177.086,22.44) C63.1@177.086,22.5
SLOT2.LVDS_0_N: IC4.AB30 J29.C2 | length 101.8
  TopLayer w0.095: IC4.AB30@154.061,39.95 v1(154.561,39.45)
  Layer 3 w0.075: v1(154.561,39.45) 154.561,39.805 154.517,39.849 154.161,39.849 153.93,40.08 153.93,41.62 154.362,42.052 179.559,42.052 182.74,38.871 186.606,38.871 187.011,38.466 187.079,38.398 187.269,38.398 187.649,38.778 188.006,38.778 188.314,38.47 188.314,38.113 186.633,36.431 186.633,36.241 186.823,36.051 187.012,36.051 188.647,37.686 189.004,37.686 189.313,37.378 189.313,37.021 187.678,35.386 187.678,35.196 187.868,35.006 188.057,35.006 189.502,36.45 189.859,36.45 190.167,36.142 190.167,35.785 188.723,34.341 188.723,34.151 188.913,33.961 189.103,33.961 190.449,35.307 190.806,35.307 191.114,34.999 191.114,34.642 191.07,34.597 191.07,34.407 191.18,34.297 191.18,33.979 191.18,33.768 191.18,33.672 191.314,33.537 192.382,33.537 192.635,33.285 192.635,32.849 192.382,32.596 188.861,32.596 188.727,32.462 188.727,32.194 188.861,32.059 192.213,32.059 192.466,31.807 192.466,31.371 192.213,31.118 190.339,31.118 190.205,30.984 190.205,30.716 190.339,30.581 191.03,30.581 191.567,30.044 192.546,29.065 193.955,29.065 194.875,29.065 195.127,28.813 195.127,27.991 195.261,27.857 195.53,27.857 195.664,27.991 195.664,29.132 195.917,29.385 196.353,29.385 196.605,29.132 196.605,27.991 196.739,27.857 197.008,27.857 197.142,27.991 197.142,28.813 197.395,29.065 199.003,29.065 212.502,29.065 212.699,29.262 212.699,29.589 212.338,29.95 J29.C2@212.1,29.95
SLOT2.LVDS_0_P: IC4.AA30 J29.B2 | length 101.5
  TopLayer w0.095: IC4.AA30@154.061,40.95 v1(154.561,40.45)
  Layer 3 w0.075: v1(154.561,40.45) 154.561,40.095 154.517,40.051 154.244,40.051 154.132,40.163 154.132,41.537 154.446,41.85 179.475,41.85 182.656,38.669 186.523,38.669 186.868,38.324 186.936,38.255 186.995,38.196 187.353,38.196 187.733,38.576 187.922,38.576 188.112,38.386 188.112,38.196 186.431,36.515 186.431,36.157 186.739,35.849 187.096,35.849 188.731,37.484 188.921,37.484 189.111,37.294 189.111,37.104 187.476,35.469 187.476,35.112 187.784,34.804 188.141,34.804 189.585,36.248 189.775,36.248 189.965,36.058 189.965,35.869 188.521,34.424 188.521,34.067 188.829,33.759 189.186,33.759 190.533,35.105 190.722,35.105 190.912,34.915 190.912,34.726 190.868,34.681 190.868,34.324 190.978,34.213 190.978,33.777 190.978,33.768 190.978,33.588 191.231,33.335 192.299,33.335 192.433,33.201 192.433,32.933 192.299,32.798 188.777,32.798 188.525,32.546 188.525,32.11 188.777,31.857 192.13,31.857 192.264,31.723 192.264,31.455 192.13,31.32 190.255,31.32 190.003,31.068 190.003,30.632 190.255,30.379 190.946,30.379 191.281,30.044 192.462,28.863 193.955,28.863 194.791,28.863 194.925,28.729 194.925,27.908 195.178,27.655 195.614,27.655 195.866,27.908 195.866,29.048 196,29.183 196.269,29.183 196.403,29.048 196.403,27.908 196.656,27.655 197.092,27.655 197.344,27.908 197.344,28.729 197.478,28.863 199.003,28.863 212.586,28.863 212.901,29.178 212.901,29.589 213.262,29.95 J29.B2@213.5,29.95
SLOT2.LVDS_1_N: IC4.W34 J29.F2 | length 99
  TopLayer w0.095: IC4.W34@158.061,42.95 v1(158.561,42.45)
  Layer 5 w0.08: 192.768,30.557 192.768,30.357 192.928,30.197 v1(192.928,30.15) ; 192.768,30.586 192.264,31.09 189.884,31.09 188.673,29.878 184.044,29.878 183.761,30.161 183.761,31.414 184.081,31.734 192.183,31.734 192.813,31.104 197.482,31.104 197.836,30.75 208.114,30.75 208.496,30.368 208.496,30.301 208.145,29.95 J29.F2@207.9,29.95
  Layer 6 w0.08: v1(158.561,42.45) 158.211,42.45 158.165,42.403 158.165,42.337 158.371,42.13 159.024,42.13 159.084,42.069 167.076,42.069 168.3,40.846 168.511,40.846 168.612,40.846 168.797,41.031 168.797,42.047 169.104,42.354 169.646,42.354 169.953,42.047 169.953,40.826 170.139,40.64 170.51,40.64 170.695,40.826 170.695,41.689 171.002,41.996 171.544,41.996 171.851,41.689 171.851,41.031 172.037,40.846 172.336,40.846 179.265,40.846 179.678,40.433 179.749,40.362 180.011,40.362 180.248,40.599 180.682,40.599 181.065,40.216 181.065,39.782 180.193,38.91 180.193,38.648 180.456,38.385 180.718,38.385 181.59,39.257 182.024,39.257 182.407,38.874 182.407,38.44 181.536,37.568 181.536,37.306 181.798,37.043 182.06,37.043 182.932,37.915 183.366,37.915 183.749,37.531 183.749,37.098 182.878,36.226 182.878,35.963 183.14,35.701 183.402,35.701 184.274,36.573 184.708,36.573 185.092,36.189 185.092,35.756 184.22,34.884 184.22,34.621 184.482,34.359 184.744,34.359 185.616,35.231 186.05,35.231 186.434,34.847 186.434,34.413 185.562,33.542 185.562,33.279 185.824,33.017 186.086,33.017 186.958,33.889 187.392,33.889 187.776,33.505 187.776,33.071 187.702,32.998 187.702,32.735 187.888,32.55 188.548,32.55 191.454,32.55 192.768,31.236 192.768,30.357 192.928,30.197 v1(192.928,30.15)
SLOT2.LVDS_1_P: IC4.W33 J29.E2 | length 99.7
  TopLayer w0.095: IC4.W33@157.061,42.95 v1(157.561,42.45)
  Layer 5 w0.08: v1(192.401,30.15) 192.401,30.197 192.561,30.357 192.561,30.5 ; 192.538,30.523 192.178,30.883 189.97,30.883 188.759,29.671 183.959,29.671 183.554,30.076 183.554,31.499 183.995,31.941 192.269,31.941 192.899,31.311 197.568,31.311 197.922,30.957 208.2,30.957 208.703,30.453 208.703,30.301 209.054,29.95 J29.E2@209.3,29.95
  Layer 6 w0.08: v1(157.561,42.45) 157.911,42.45 157.958,42.403 157.958,42.251 158.286,41.923 158.938,41.923 158.999,41.862 166.99,41.862 168.214,40.639 168.511,40.639 168.697,40.639 169.004,40.945 169.004,41.961 169.19,42.147 169.561,42.147 169.746,41.961 169.746,40.74 170.053,40.433 170.595,40.433 170.902,40.74 170.902,41.603 171.088,41.789 171.459,41.789 171.644,41.603 171.644,40.945 171.951,40.639 172.336,40.639 179.18,40.639 179.531,40.287 179.602,40.216 179.663,40.155 180.097,40.155 180.334,40.392 180.596,40.392 180.858,40.13 180.858,39.868 179.986,38.996 179.986,38.562 180.37,38.178 180.804,38.178 181.676,39.05 181.938,39.05 182.2,38.788 182.2,38.525 181.329,37.654 181.329,37.22 181.712,36.836 182.146,36.836 183.018,37.708 183.28,37.708 183.542,37.446 183.542,37.183 182.671,36.312 182.671,35.878 183.054,35.494 183.488,35.494 184.36,36.366 184.622,36.366 184.885,36.104 184.885,35.841 184.013,34.969 184.013,34.536 184.396,34.152 184.83,34.152 185.702,35.024 185.964,35.024 186.227,34.762 186.227,34.499 185.355,33.627 185.355,33.194 185.738,32.81 186.172,32.81 187.044,33.682 187.306,33.682 187.569,33.419 187.569,33.157 187.495,33.084 187.495,32.65 187.802,32.343 188.341,32.343 191.368,32.343 192.561,31.15 192.561,30.357 192.401,30.197 v1(192.401,30.15)
SLOT2.LVDS_2_N: IC4.AA33 J33.F8 | length 101
  TopLayer w0.095: IC4.AA33@157.061,40.95 v1(157.561,40.45)
  Layer 3 w0.075: v1(157.561,40.45) 157.206,40.45 157.162,40.494 157.162,40.771 157.249,40.859 178.767,40.859 182.435,37.19 182.563,37.062 182.92,37.062 183.813,37.955 184.003,37.955 184.193,37.765 184.193,37.576 182.958,36.341 182.958,35.983 183.266,35.675 183.623,35.675 185.903,37.955 186.093,37.955 186.283,37.765 186.283,37.576 184.003,35.295 184.003,34.938 184.311,34.63 184.668,34.63 185.81,35.772 186,35.772 186.19,35.582 186.19,35.392 185.048,34.25 185.048,33.893 185.356,33.585 185.714,33.585 186.855,34.727 187.045,34.727 187.235,34.537 187.235,34.347 186.093,33.205 186.093,32.848 186.401,32.54 186.759,32.54 187.9,33.682 188.09,33.682 188.28,33.492 188.28,33.302 187.138,32.16 187.138,31.803 187.447,31.495 187.804,31.495 187.872,31.563 188.062,31.563 188.287,31.339 188.355,31.27 192.331,27.294 192.724,26.902 192.895,26.902 193.029,26.767 193.029,26.105 193.282,25.853 193.718,25.853 193.97,26.105 193.97,27.316 194.105,27.45 194.373,27.45 194.507,27.316 194.507,25.04 194.76,24.787 195.196,24.787 195.448,25.04 195.448,26.944 195.583,27.078 195.851,27.078 195.985,26.944 195.985,23.68 196.238,23.427 196.674,23.427 196.926,23.68 196.926,26.944 197.061,27.078 197.329,27.078 197.463,26.944 197.463,23.68 197.716,23.427 198.152,23.427 198.404,23.68 198.404,26.767 198.539,26.902 198.635,26.902 208.331,26.902 208.499,26.734 208.499,26.311 208.138,25.95 J33.F8@207.9,25.95
SLOT2.LVDS_2_P: IC4.AA32 J33.E8 | length 101.7
  TopLayer w0.095: IC4.AA32@156.061,40.95 v1(156.561,40.45)
  Layer 3 w0.075: v1(156.561,40.45) 156.916,40.45 156.96,40.494 156.96,40.855 157.166,41.061 178.85,41.061 182.578,37.333 182.647,37.264 182.837,37.264 183.729,38.157 184.087,38.157 184.395,37.849 184.395,37.492 183.16,36.257 183.16,36.067 183.35,35.877 183.54,35.877 185.82,38.157 186.177,38.157 186.485,37.849 186.485,37.492 184.205,35.212 184.205,35.022 184.395,34.832 184.585,34.832 185.727,35.974 186.084,35.974 186.392,35.666 186.392,35.309 185.25,34.167 185.25,33.977 185.44,33.787 185.63,33.787 186.772,34.929 187.129,34.929 187.437,34.621 187.437,34.263 186.295,33.122 186.295,32.932 186.485,32.742 186.675,32.742 187.817,33.884 188.174,33.884 188.482,33.576 188.482,33.218 187.34,32.076 187.34,31.887 187.53,31.697 187.72,31.697 187.789,31.765 188.146,31.765 188.223,31.688 188.429,31.482 188.498,31.413 192.331,27.58 192.807,27.104 192.979,27.104 193.231,26.851 193.231,26.189 193.366,26.055 193.634,26.055 193.768,26.189 193.768,27.4 194.021,27.652 194.457,27.652 194.709,27.4 194.709,25.124 194.844,24.99 195.112,24.99 195.246,25.124 195.246,27.027 195.499,27.28 195.935,27.28 196.187,27.027 196.187,23.763 196.322,23.629 196.59,23.629 196.724,23.763 196.724,27.027 196.977,27.28 197.413,27.28 197.665,27.027 197.665,23.763 197.8,23.629 198.068,23.629 198.202,23.763 198.202,26.851 198.455,27.104 198.635,27.104 208.415,27.104 208.701,26.818 208.701,26.311 209.062,25.95 J33.E8@209.3,25.95
SLOT2.LVDS_3_N: IC4.AC29 J29.H5 | length 101.4
  TopLayer w0.095: IC4.AC29@153.061,38.95 v1(153.561,38.45)
  layer 8 w0.075: v1(153.561,38.45) 153.206,38.45 153.162,38.406 153.162,38.135 153.247,38.05 156.752,38.05 156.994,38.293 156.994,38.685 157.362,39.052 165.592,39.052 166.439,38.205 167.144,37.5 167.681,36.963 171.412,36.963 171.924,36.45 171.998,36.377 175.561,36.377 175.645,36.377 175.658,36.377 175.842,36.561 175.842,36.61 176.145,36.913 176.681,36.913 176.983,36.61 176.983,35.162 177.167,34.978 177.536,34.978 177.72,35.162 177.72,36.698 178.023,37 178.559,37 178.861,36.698 178.861,35.162 179.045,34.978 179.414,34.978 179.598,35.162 179.598,36.698 179.901,37 180.437,37 180.739,36.698 180.739,35.16 180.923,34.976 181.292,34.976 181.476,35.16 181.476,36.698 181.779,37 182.315,37 182.617,36.698 182.617,34.786 182.801,34.601 183.17,34.601 183.354,34.786 183.354,36.698 183.657,37 184.193,37 184.495,36.698 184.495,34.786 184.679,34.601 185.048,34.601 185.232,34.786 185.232,36.698 185.535,37 186.071,37 186.373,36.698 186.373,34.786 186.557,34.601 186.926,34.601 187.11,34.786 187.11,36.698 187.413,37 187.949,37 188.251,36.698 188.251,34.786 188.435,34.601 188.804,34.601 188.988,34.786 188.988,36.698 189.291,37 189.827,37 190.129,36.698 190.129,34.786 190.313,34.601 190.682,34.601 190.866,34.786 190.866,36.698 191.169,37 191.705,37 192.007,36.698 192.007,33.022 192.191,32.838 192.56,32.838 192.744,33.022 192.744,36.698 193.047,37 193.583,37 193.885,36.698 193.885,35.234 194.069,35.05 194.188,34.932 194.188,33.08 194.272,32.995 cw(c193.911,32.35) 194.447,32.859 194.469,32.837 197.462,32.837 198.32,33.695 198.32,34.485 198.885,35.05 205.488,35.05 205.599,35.16 205.599,35.589 205.238,35.95 J29.H5@205,35.95
SLOT2.LVDS_3_P: IC4.AC28 J29.G5 | length 102
  TopLayer w0.095: IC4.AC28@152.061,38.95 v1(152.561,38.45)
  layer 8 w0.075: v1(152.561,38.45) 152.916,38.45 152.96,38.406 152.96,38.051 153.163,37.848 156.835,37.848 157.197,38.209 157.197,38.601 157.445,38.85 165.508,38.85 166.237,38.121 166.929,37.429 167.597,36.761 171.328,36.761 171.914,36.175 175.561,36.175 175.742,36.175 176.044,36.477 176.044,36.526 176.228,36.711 176.597,36.711 176.781,36.526 176.781,35.079 177.084,34.776 177.62,34.776 177.922,35.079 177.922,36.614 178.106,36.798 178.475,36.798 178.659,36.614 178.659,35.079 178.962,34.776 179.498,34.776 179.8,35.079 179.8,36.614 179.984,36.798 180.353,36.798 180.537,36.614 180.537,35.076 180.84,34.774 181.376,34.774 181.678,35.076 181.678,36.614 181.862,36.798 182.231,36.798 182.415,36.614 182.415,34.702 182.718,34.399 183.254,34.399 183.556,34.702 183.556,36.614 183.74,36.798 184.109,36.798 184.293,36.614 184.293,34.702 184.596,34.399 185.132,34.399 185.434,34.702 185.434,36.614 185.618,36.798 185.987,36.798 186.171,36.614 186.171,34.702 186.474,34.399 187.01,34.399 187.312,34.702 187.312,36.614 187.496,36.798 187.865,36.798 188.049,36.614 188.049,34.702 188.352,34.399 188.888,34.399 189.19,34.702 189.19,36.614 189.374,36.798 189.743,36.798 189.927,36.614 189.927,34.702 190.23,34.399 190.766,34.399 191.068,34.702 191.068,36.614 191.252,36.798 191.621,36.798 191.805,36.614 191.805,32.939 192.108,32.636 192.644,32.636 192.946,32.939 192.946,36.614 193.13,36.798 193.499,36.798 193.683,36.614 193.683,35.151 193.986,34.848 193.986,32.996 194.151,32.831 cw(c193.911,32.35) 194.302,32.718 194.304,32.716 194.386,32.635 197.546,32.635 198.522,33.611 198.522,34.401 198.969,34.848 205.572,34.848 205.801,35.077 205.801,35.589 206.162,35.95 J29.G5@206.4,35.95